# Altium PCB PCB1.pcbdoc (part 1 of 2)
Units mil, origin at the board's own origin, x right, y up, seen from the top; angles counter-clockwise.
Board outline 1771.65 x 1825.33 mil, 2 copper layers (Top Layer, Bottom Layer), stack 62.206 mil thick; 72 components, 46 nets, 229 pads, 305 vias.
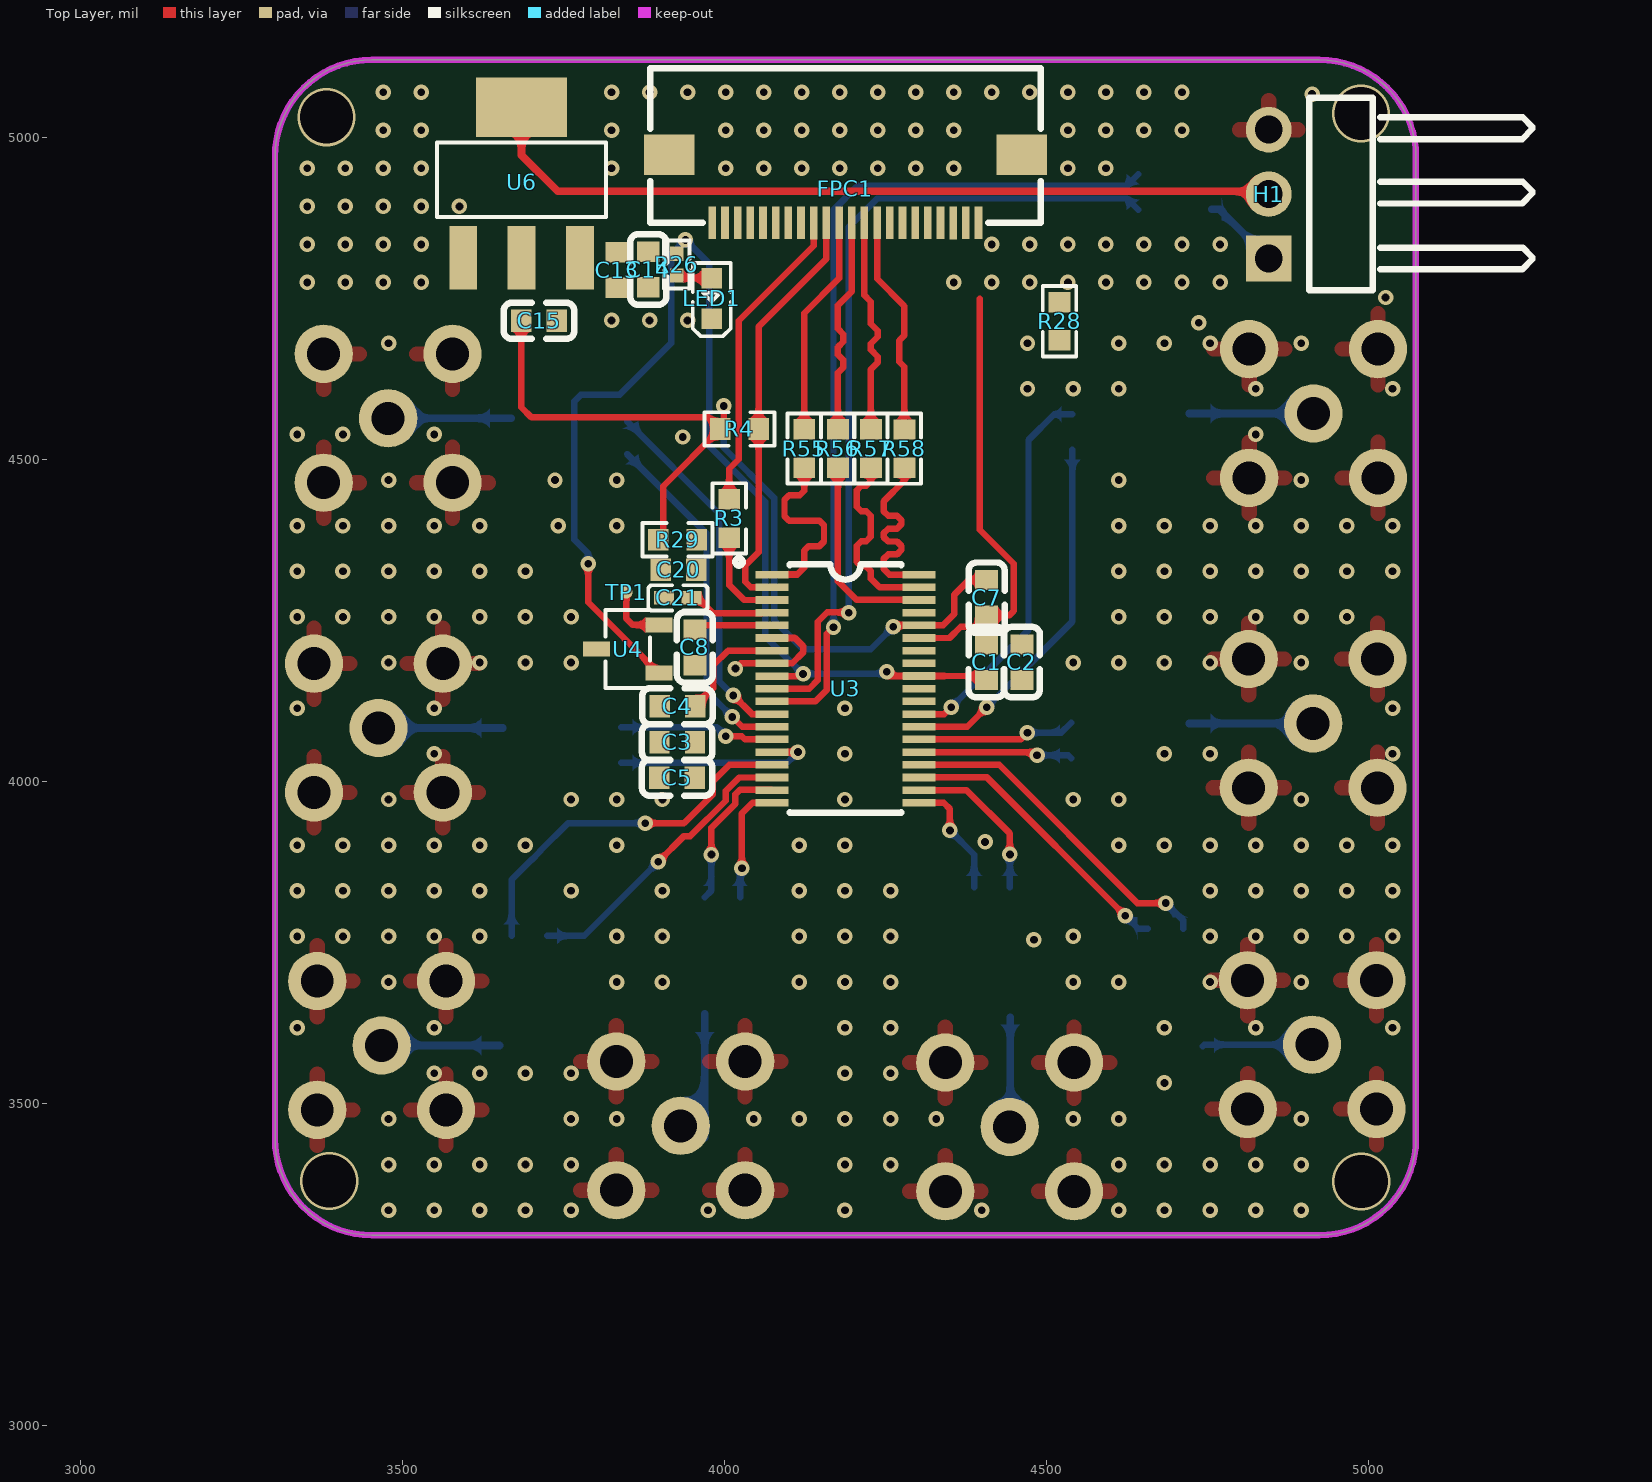
[diagram p0: Top Layer view]
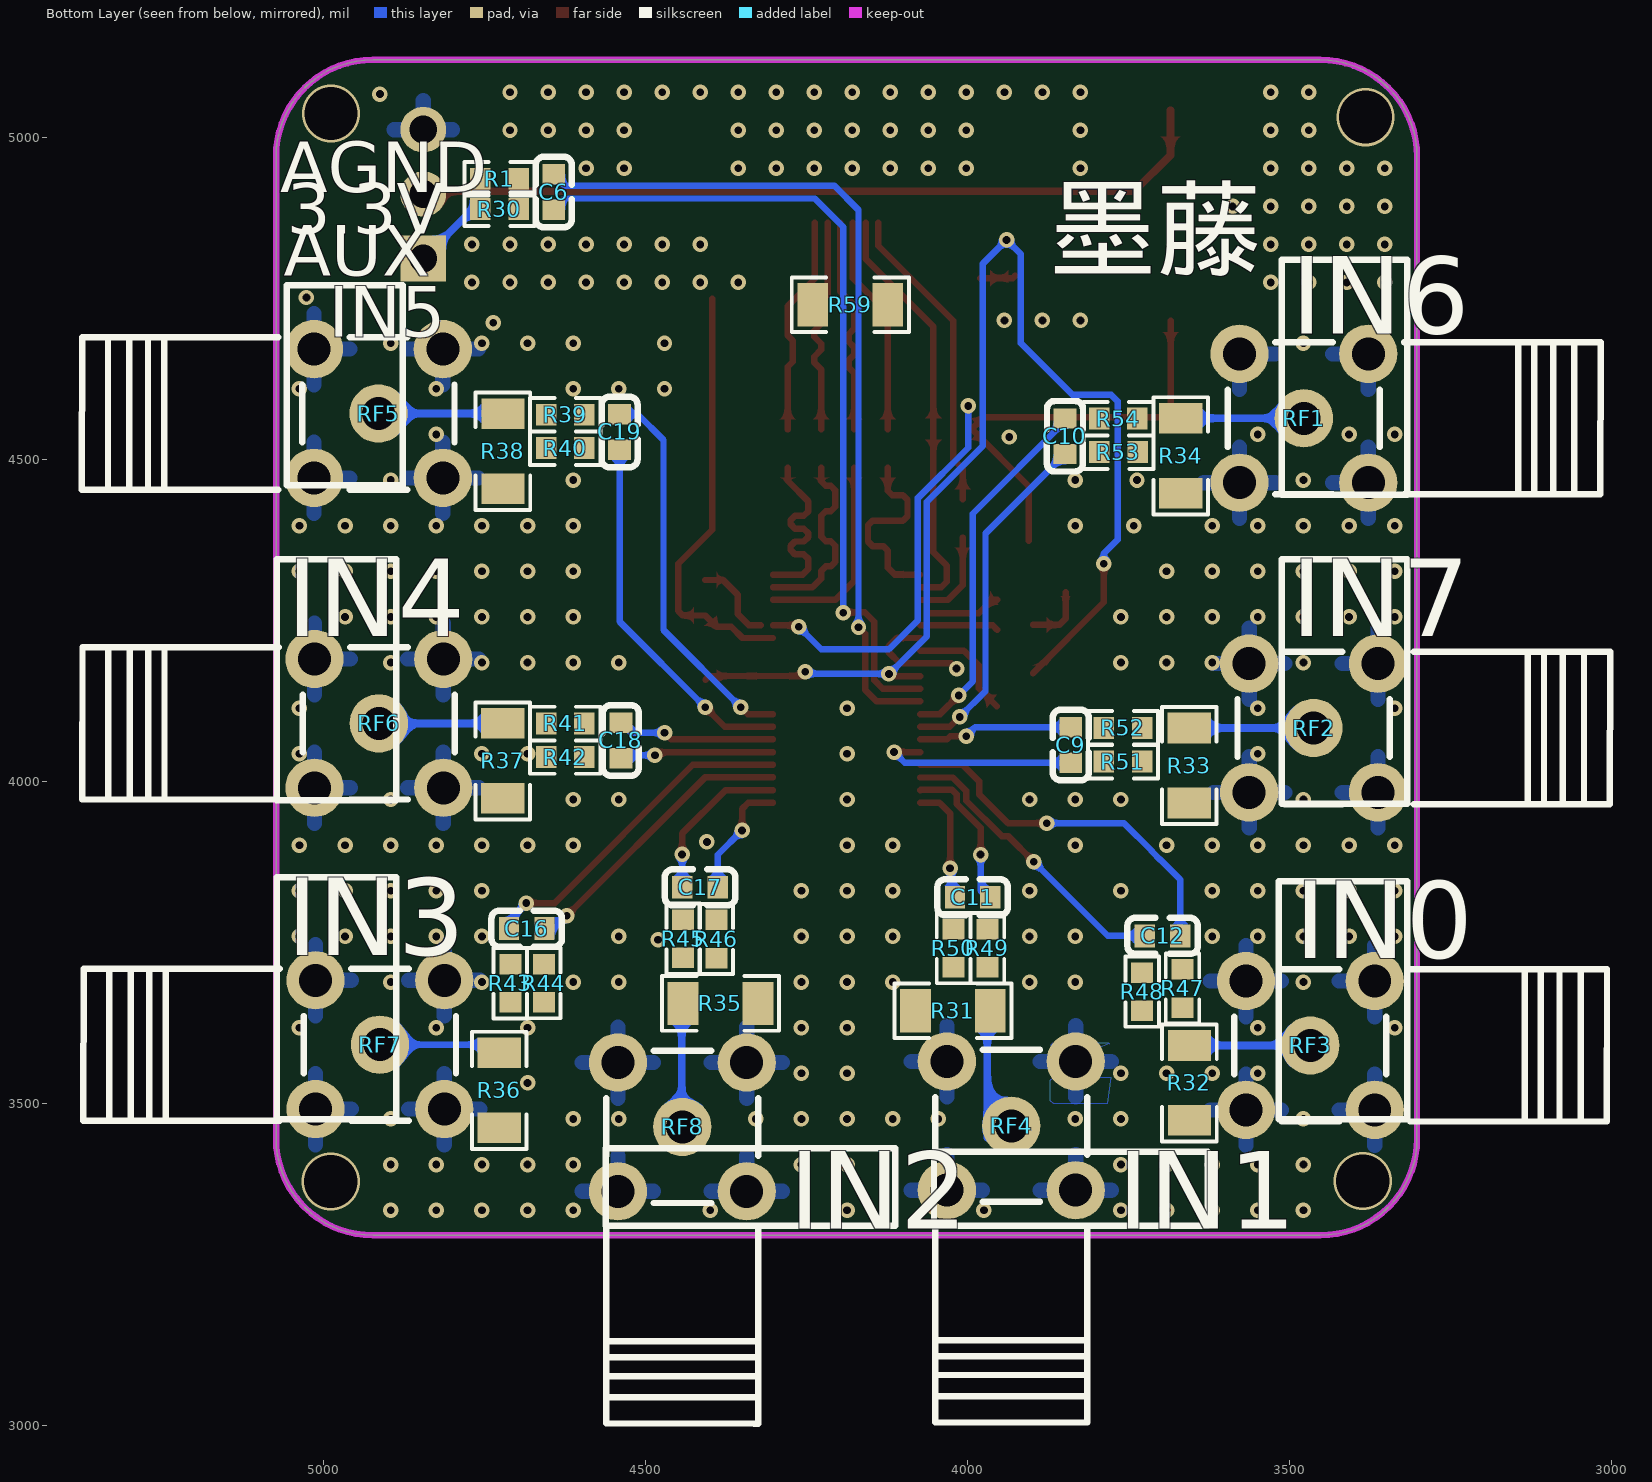
[diagram p1: Bottom Layer view, seen from below]

## Layer stack, top to bottom
Top Solder Mask Layer: solder mask 0.394, Dk 3.3
Top Layer: signal copper 1.379
Dielectric1: surface 59.449, FR4, Dk 4.5
Bottom Layer: signal copper 1.378
Bottom Solder Mask Layer: solder mask 0.394, Dk 3.3

## Board outline
3452.36,3294.69 4924.01,3294.69 ccw(c4924.01,3444.69) 5074.01,3444.69 5074.01,4970.05 ccw(c4924.03,4970.04) 4924.01,5120.02 3452.36,5120.02 ccw(c3452.34,4970.04) 3302.36,4970.05 3302.36,3444.69 ccw(c3452.36,3444.69)

## Design rules (kind name [scope] priority, off if disabled: settings)
BoardOutlineClearance copperThickness1oz [All] p0: genericclearance=10 ignorepadtopadclearanceinfootprint=FALSE except(0: Arc-SplitContinuation Track-SplitContinuation SMDPad-SplitContinuation THPad-SplitContinuation Via-SplitContinuation Fill-SplitContinuation Poly-SplitContinuation Region-SplitContinuation Text-SplitContinuation)
BoardOutlineClearance copperThickness2oz [All] p0: genericclearance=10 ignorepadtopadclearanceinfootprint=FALSE except(0: Arc-SplitContinuation Track-SplitContinuation SMDPad-SplitContinuation THPad-SplitContinuation Via-SplitContinuation Fill-SplitContinuation Poly-SplitContinuation Region-SplitContinuation Text-SplitContinuation)
BoardOutlineClearance Plane_innerPlane [All] p0: genericclearance=10 ignorepadtopadclearanceinfootprint=FALSE except(0: Arc-SplitContinuation Track-SplitContinuation SMDPad-SplitContinuation THPad-SplitContinuation Via-SplitContinuation Fill-SplitContinuation Poly-SplitContinuation Region-SplitContinuation Text-SplitContinuation)
BoardOutlineClearance Copper_copperRegion [All] p0: genericclearance=10 ignorepadtopadclearanceinfootprint=FALSE except(0: Arc-SplitContinuation Track-SplitContinuation SMDPad-SplitContinuation THPad-SplitContinuation Via-SplitContinuation Fill-SplitContinuation Poly-SplitContinuation Region-SplitContinuation Text-SplitContinuation)
BoardOutlineClearance otherClearance [All] p0: genericclearance=10 ignorepadtopadclearanceinfootprint=FALSE except(0: Arc-SplitContinuation Track-SplitContinuation SMDPad-SplitContinuation THPad-SplitContinuation Via-SplitContinuation Fill-SplitContinuation Poly-SplitContinuation Region-SplitContinuation Text-SplitContinuation)
Clearance copperThickness1oz [All] p1: gap=7 ignorepadtopadclearanceinfootprint=FALSE
Clearance copperThickness2oz [All] p1: gap=7 ignorepadtopadclearanceinfootprint=FALSE
Clearance Plane_innerPlane [All] p1: gap=7 ignorepadtopadclearanceinfootprint=FALSE
Clearance Copper_copperRegion [All] p1: gap=7 ignorepadtopadclearanceinfootprint=FALSE
Clearance otherClearance [All] p1: gap=7 ignorepadtopadclearanceinfootprint=FALSE
DiffPairsRouting differentialPair [All] p1: maxuncoupledlength=10 minlimit=6 maxlimit=Infinity mostfreqgap=6 toplayer_minwidth=5 toplayer_prefwidth=10 toplayer_maxwidth=100 bottomlayer_minwidth=5 bottomlayer_prefwidth=10 bottomlayer_maxwidth=100
PasteMaskExpansion pasteMaskExpansion [All] p1: expansion=0
PlaneConnect innerPlane [All] p1: planeconnectstyle=Relief reliefexpansion=20 reliefentries=4 reliefconductorwidth=10 reliefairgap=10
PolygonConnect copperRegion [All] p1: connectstyle=Relief reliefentries=4 reliefconductorwidth=23.622 polygonreliefangle="90 Angle" airgapwidth=10
RoutingVias viaSize [All] p1: viastyle="Through Hole" holewidth=12.0078 minholewidth=11.811 maxholewidth=248.0314 width=12.0078 minwidth=11.811 maxwidth=248.0314
SolderMaskExpansion solderMaskExpansion [All] p1: useseparateexpansions=TRUE expansion=2 expansionbottom=2
Width copperThickness1oz [All] p1: maxlimit=100 minlimit=5 preferedwidth=10
Width copperThickness2oz [All] p1: maxlimit=100 minlimit=8 preferedwidth=10

## Components (designator, comment, footprint, x,y, rotation, side; value= is the part's Value field where it differs from the comment)
C1 "" C0603 4407.22,4184.71 r90 top
C2 "" C0603 4462.22,4184.71 r90 top
C3 "" C0603 3926.83,4060.33 r0 top
C4 "" C0603 3927.19,4116.15 r0 top
C5 "" C0603 3926.8,4005.33 r180 top
C6 "" C0603 4642.72,4914.68 r270 bottom
C7 "" C0603 4407.36,4284.69 r270 top
C8 "" C0603 3954.39,4207.58 r90 top
C9 "" C0603 3840.05,4055.92 r90 bottom
C10 "" C0603 3848.99,4535.49 r90 bottom
C11 "" C0603 3992.36,3819.69 r180 bottom
C12 "" C0603 3697.36,3759.69 r180 bottom
C13 "" C0603 3833.49,4793.58 r90 top
C14 "" C0603 3881.86,4794.37 r90 top
C15 "" C0603 3712.36,4714.69 r0 top
C16 "" C0603 4684.84,3770.9 r180 bottom
C17 "" C0603 4415.55,3835.13 r180 bottom
C18 "" C0603 4538.61,4063.17 r270 bottom
C19 "" C0603 4540.63,4542.11 r270 bottom
C20 "" C0603 3928.98,4328.3 r180 top
C21 "" C0402 3927.97,4284.52 r180 top
FPC1 "" FPC-SMD_P0.5-22P_FGS-XJ-H2.0 4188.19,4919.69 r0 top
H1 "" HDR-TH_3P-P2.54-H-M-W10.4 4845.4,4911.52 r90 top
LED1 "" LED0603-RD 3980.72,4749.54 r90 top
R1 "" R0603 4727.09,4935.36 r180 bottom
R3 "" R0603 4007.66,4407.87 r270 top
R4 "" R0603 4023.54,4546.77 r180 top
R26 "" R0402 3926.22,4802.07 r90 top
R28 "" R0603 4520.58,4714.08 r270 top
R29 "" R0603 3927.36,4374.69 r180 top
R30 "" R0603 4727.09,4888.06 r180 bottom
R31 "" R1206 4022.94,3643.34 r180 bottom
R32 "" R1206 3655.84,3531.3 r90 bottom
R33 "" R1206 3655.97,4024.17 r90 bottom
R34 "" R1206 3669.23,4505.1 r90 bottom
R35 "" R1206 4383.9,3654.9 r0 bottom
R36 "" R1206 4727.36,3519.69 r90 bottom
R37 "" R1206 4721.99,4031.31 r90 bottom
R38 "" R1206 4721.81,4512.16 r270 bottom
R39 "" R0603 4624.95,4568.91 r0 bottom
R40 "" R0603 4624.93,4517.02 r0 bottom
R41 "" R0603 4625,4089.5 r0 bottom
R42 "" R0603 4624.96,4037.31 r0 bottom
R43 "" R0603 4710.27,3686.16 r270 bottom
R44 "" R0603 4658.24,3686.19 r270 bottom
R45 "" R0603 4441.96,3755.31 r270 bottom
R46 "" R0603 4390.34,3754.71 r270 bottom
R47 "" R0603 3666.46,3678.02 r90 bottom
R48 "" R0603 3729.16,3673.02 r90 bottom
R49 "" R0603 3969.38,3740.61 r90 bottom
R50 "" R0603 4022.08,3740.61 r90 bottom
R51 "" R0603 3758.88,4030.32 r0 bottom
R52 "" R0603 3758.88,4082.62 r0 bottom
R53 "" R0603 3765.94,4510.75 r0 bottom
R54 "" R0603 3766.09,4562.77 r0 bottom
R55 "" R0603 4124.2,4516.4 r90 top
R56 "" R0603 4176.5,4516.4 r90 top
R57 "" R0603 4227.53,4516.4 r90 top
R58 "" R0603 4279.58,4516.33 r90 top
R59 "" R1206 4182.36,4739.69 r180 bottom
RF1 "" ANT-TH_KH-SMA-K513-G 3477.99,4563.39 r0 bottom
RF2 "" ANT-TH_KH-SMA-K513-G 3462.99,4082.44 r0 bottom
RF3 "" ANT-TH_KH-SMA-K513-G 3467.99,3589.49 r0 bottom
RF4 "" ANT-TH_KH-SMA-K513-G 3932.36,3464.69 r90 bottom
RF5 "" ANT-TH_KH-SMA-K513-G 4915.03,4570.78 r180 bottom
RF6 "" ANT-TH_KH-SMA-K513-G 4914.35,4089.56 r180 bottom
RF7 "" ANT-TH_KH-SMA-K513-G 4912.74,3590.69 r180 bottom
RF8 "" ANT-TH_KH-SMA-K513-G 4443.16,3462.99 r90 bottom
TP1 "" Test-Point-0.5mm 3847.89,4293.39 r0 top
U3 "" TSSOP-38_L9.7-W4.4-P0.50-LS6.4-BL 4188.19,4143.47 r270 top
U4 "" SOT-23-3_L2.9-W1.6-P1.90-LS2.8-BR 3849.99,4205.09 r0 top
U6 "" SOT-223-3_L6.5-W3.4-P2.30-LS7.0-BR 3685.14,4929.68 r270 top

## Footprints (in the part's own frame and the unit in brackets; to place one, negate y for a bottom-side part, rotate by r counter-clockwise, add the part's x,y. Pads: shape width x height; smd on the part's side, far side on the other; paste and mask are expansions set on the pad)
ANT-TH_KH-SMA-K513-G [mm]
  round 2.3 hole 1.3: 1(-2.54,-2.54) 2(-2.54,2.54) 3(2.54,2.54) 4(2.54,-2.54) 5(0,0)
  silkscreen extent -11.7,-3 3,3
C0402 [mm]
  rect 0.79x0.54 smd: 1(-0.545,0) 2(0.545,0)
  silkscreen extent -1.17,-0.5 1.17,0.5
C0603 [mm]
  rect 0.8x0.9 smd: 1(-0.7,0) 2(0.7,0)
  silkscreen extent -1.39,-0.71 1.39,0.71
FPC-SMD_P0.5-22P_FGS-XJ-H2.0 [mm]
  rect 0.3x1.3 smd: 1(-5.252,-1.338) 2(-4.752,-1.338) 3(-4.252,-1.338) 4(-3.752,-1.338) 5(-3.252,-1.338) 6(-2.752,-1.338) 7(-2.252,-1.338) 8(-1.752,-1.338) 9(-1.25,-1.339) 10(-0.752,-1.338) 11(-0.252,-1.338) 12(0.248,-1.338) 13(0.748,-1.338) 14(1.248,-1.338) 15(1.748,-1.338) 16(2.248,-1.338) 17(2.748,-1.338) 18(3.248,-1.338) 19(3.748,-1.338) 20(4.25,-1.339) 21(4.748,-1.338) 22(5.248,-1.338)
  rect 2x1.6 smd: 23(6.95,1.339) 24(-6.95,1.339)
  silkscreen extent -7.7,-1.34 7.7,4.76
HDR-TH_3P-P2.54-H-M-W10.4 [mm]
  rect 1.8x1.8 hole 1.1: 1(-2.54,0)
  round 1.8 hole 1.1: 2(0,0) 3(2.54,0)
  silkscreen extent -3.8,-10.4 3.8,-1.6
LED0603-RD [mm]
  rect 0.8x0.8 smd: 1(-0.799,0) 2(0.799,0)
  silkscreen extent -1.49,-0.75 1.39,0.76
R0402 [mm]
  rect 0.566x0.54 smd: 1(-0.433,0) 2(0.433,0)
  silkscreen extent -0.94,-0.5 0.94,0.5
R0603 [mil]
  rect 31.75x34.02 smd: 1(-29.66,0) 2(29.66,0)
  silkscreen extent -55,-26 55,26
R1206 [mil]
  rect 47.54x66.97 smd: 1(-58.22,0) 2(58.22,0)
  silkscreen extent -91,-42 91,42
SOT-23-3_L2.9-W1.6-P1.90-LS2.8-BR [mm]
  rect 1.07x0.6 smd: 1(1.235,-0.95) 2(1.235,0.95) 3(-1.235,0)
  silkscreen extent -0.88,-1.54 0.88,1.54
SOT-223-3_L6.5-W3.4-P2.30-LS7.0-BR [mm]
  rect 2.5x1.1 smd: 1(2.97,-2.3) 2(2.97,0) 3(2.97,2.3)
  rect 2.34x3.6 smd: 4(-2.97,0)
  silkscreen extent -1.57,-3.33 1.37,3.33
Test-Point-0.5mm [mm]
  round 0.5 smd: 1(0,0)
TSSOP-38_L9.7-W4.4-P0.50-LS6.4-BL [mm]
  rect 0.3x1.3 smd: 1(-4.501,-2.899) 2(-3.999,-2.901) 3(-3.498,-2.901) 4(-2.999,-2.901) 5(-2.499,-2.901) 6(-1.999,-2.901) 7(-1.499,-2.901) 8(-0.999,-2.901) 9(-0.499,-2.901) 10(0.001,-2.901) 11(0.501,-2.901) 12(1.001,-2.901) 13(1.501,-2.901) 14(2.001,-2.901) 15(2.501,-2.901) 16(3.001,-2.901) 17(3.501,-2.901) 18(4.001,-2.901) 19(4.501,-2.901) 20(4.5,2.899) 21(4.001,2.9) 22(3.501,2.899) 23(3.002,2.899) 24(2.499,2.901) 25(2,2.9) 26(1.5,2.9) 27(1,2.9) 28(0.5,2.9) 29(0,2.9) 30(-0.5,2.9) 31(-1,2.9) 32(-1.5,2.9) 33(-2,2.9) 34(-2.5,2.9) 35(-3,2.9) 36(-3.5,2.9) 37(-4,2.9) 38(-4.5,2.9)
  silkscreen extent -5.14,-4.34 4.9,2.2

## Via types
v1: diameter 24.02, hole 12.01, Top Layer to Bottom Layer, 301 vias
v2: diameter 90.55, hole 82.68, Top Layer to Bottom Layer, 4 vias

## Nets (pads, with @x,y where several pads share a name; then routed paths per layer and width w, separated by ;. In a path a pad name is that pad's centre, name@x,y a point inside that pad or via, vN(x,y) a via of type N, cw(c..) or ccw(c..) an arc to the next point about the centre after c; other vN are vias at no path point)
3.3V: C7.1 C15.1 H1.2 R4.2 R29.2 U3.34 U6.2 U6.4 | length 2716.9
  Top Layer w10: C15.1@3684.8,4714.69 3684.8,4580.67 3700.78,4564.69 3975.96,4564.69 R4.2@3993.88,4546.77 ; R29.2@3905.16,4373.36 3905.16,4458.05 R4.2@3993.88,4546.77 ; v1(3999.37,4582.53) 3999.37,4552.26 R4.2@3993.88,4546.77 ; v1(4262.36,4239.69) 4264.56,4241.89 U3.34@4302.35,4241.89 ; U3.34@4321.64,4242.02 4339.69,4242.02 4357.36,4259.69 4357.36,4289.69 4379.92,4312.25 C7.1@4407.36,4312.25
  Top Layer w12: U6.4@3685.14,5041.6 3685.14,4971.92 3741.32,4915.73 4841.18,4915.73 H1.2@4845.4,4911.52
  Bottom Layer w10: v1(3999.37,4582.53) 3999.37,4517.68 4077.36,4439.69 4077.36,4249.69 4122.36,4204.69 4227.36,4204.69 v1(4262.36,4239.69)
5V_USB: C1.1 C2.1 C13.2 C14.2 FPC1.1 FPC1.2 FPC1.3 FPC1.4 FPC1.5 FPC1.6 FPC1.7 FPC1.8 R26.2 U3.9 U3.30 U4.1 U6.3 | length 1923.4
  Top Layer w10: v1(3788.61,4337.69) 3788.61,4277.69 U4.1@3898.61,4167.69 ; U3.9@4073.97,4163.11 4119.05,4163.11 v1(4122.36,4166.42) ; v1(4252.36,4169.69) 4258.91,4163.15 U3.30@4302.35,4163.15 4401.22,4163.15 C1.1@4407.22,4157.15
  Bottom Layer w10: v1(3788.61,4337.69) 3788.61,4353.44 3767.36,4374.69 3767.36,4589.69 3777.36,4599.69 3837.36,4599.69 3917.36,4679.69 3917.36,4817.96 v1(3939.71,4840.31) 3976.38,4803.64 3976.38,4520.85 4063.35,4433.89 4063.35,4224.87 v1@4121.34,4166.87 ; v1(4122.36,4166.42) 4249.09,4166.42 v1(4252.36,4169.69)
$1N881: C3.2 C4.2 C5.1 U3.7 | length 175.6
  Top Layer w10: C4.2@3954.75,4116.15 3983.09,4144.49 3983.09,4179.69 4005.88,4202.48 U3.7@4073.97,4202.48
$1N1310: R3.2 U3.3 | length 149.7
  Top Layer w10: R3.2@4007.66,4378.21 4007.66,4304.39 4030.86,4281.2 U3.3@4073.97,4281.2
$1N2306: C20.1 C21.1 R29.1 U3.4 | length 112.3
  Top Layer w10: C21.1@3954.21,4281.44 3962.38,4281.44 3983.07,4260.75 U3.4@4057.98,4260.75
$1N2496: C10.2 R54.2 U3.12 | length 570.3
  Top Layer w10: v1(4014.09,4132.97) 4043,4104.06 U3.12@4073.97,4104.06
  Bottom Layer w10: C10.2@3848.99,4563.05 3848.99,4558.65 3992.36,4415.28 3992.36,4154.69 v1(4014.09,4132.97)
$1N2502: C10.1 R53.2 U3.13 | length 543.9
  Top Layer w10: v1(4012.36,4099.69) 4027.69,4084.37 U3.13@4073.97,4084.37
  Bottom Layer w10: C10.1@3848.99,4507.93 3972.36,4384.56 3972.36,4139.69 v1(4012.36,4099.69)
$1N2508: C9.2 R52.2 U3.14 | length 241.7
  Top Layer w10: v1(4002.36,4069.69) 4027.36,4069.69 4032.36,4064.69 U3.14@4073.97,4064.69
  Bottom Layer w10: C9.2@3840.05,4083.48 3988.57,4083.48 v1(4002.36,4069.69)
$1N2515: C9.1 R51.2 U3.15 | length 324.7
  Top Layer w10: U3.15@4073.97,4045 4117.06,4045 v1@4117.36,4044.69
  Bottom Layer w10: C9.1@3840.05,4028.36 4097.66,4028.36 v1(4114.36,4045.06)
$1N2525: C12.2 R47.2 U3.16 | length 577.5
  Top Layer w10: v1(3877.36,3934.69) 3937.36,3934.69 3982.36,3979.69 3982.36,3999.69 4007.99,4025.32 U3.16@4073.97,4025.32
  Bottom Layer w10: C12.2@3669.8,3759.69 3669.8,3847.13 3700.24,3877.57 3700.82,3877.57 3714.29,3891.03 3714.29,3891.62 3757.36,3934.69 v1(3877.36,3934.69)
$1N2534: C11.2 R49.2 U3.18 | length 239.9
  Top Layer w10: v1(3980.1,3885.86) 3980.1,3927.43 4017.36,3964.69 4017.36,3979.69 4024.43,3986.76 4073.16,3986.76 U3.18@4073.97,3985.95
  Bottom Layer w10: C11.2@3969.49,3819.48 3980.1,3830.09 v1(3980.1,3885.86)
$1N2541: C12.1 R48.2 U3.17 | length 459.7
  Top Layer w10: v1(3897.36,3874.69) 3937.36,3914.69 3947.36,3914.69 4002.36,3969.69 4002.36,3984.69 4023.3,4005.63 U3.17@4073.97,4005.63
  Bottom Layer w10: C12.1@3724.92,3759.69 3782.36,3759.69 v1(3897.36,3874.69)
$1N2549: C11.1 R50.2 U3.19 | length 184.8
  Top Layer w10: v1(4027.36,3864.69) 4027.36,3949.69 4043.93,3966.26 U3.19@4073.97,3966.26
  Bottom Layer w10: C11.1@4024.61,3819.48 4024.61,3861.94 v1(4027.36,3864.69)
$1N3102: C19.1 R39.1 U3.27 | length 603.9
  Top Layer w10: U3.27@4302.35,4104.1 4341.77,4104.1 v1(4352.36,4114.69)
  Bottom Layer w10: v1(4352.36,4114.69) 4472.36,4234.69 4472.36,4529.69 4512.34,4569.67 C19.1@4540.63,4569.67
$1N3111: C19.2 R40.1 U3.26 | length 572.6
  Top Layer w10: U3.26@4302.35,4084.41 4377.08,4084.41 v1(4407.36,4114.69)
  Bottom Layer w10: v1(4407.36,4114.69) 4540.63,4247.96 C19.2@4540.63,4514.55
$1N3136: C16.1 R43.1 U3.23 | length 523
  Top Layer w10: U3.23@4302.33,4025.28 4426.78,4025.28 4641.4,3810.65 v1(4685.5,3810.65)
  Bottom Layer w10: v1(4685.5,3810.65) 4712.4,3783.75 C16.1@4712.4,3770.9
$1N3142: C16.2 R44.1 U3.22 | length 452.2
  Top Layer w10: U3.22@4302.33,4005.66 4407.97,4005.66 v1(4622.74,3790.89)
  Bottom Layer w10: v1(4622.74,3790.89) 4642.72,3770.9 C16.2@4657.28,3770.9
$1N3148: C17.1 R45.1 U3.21 | length 252.7
  Top Layer w10: U3.21@4302.36,3985.94 4376.12,3985.94 4443.53,3918.52 v1(4443.53,3886.07)
  Bottom Layer w10: C17.1@4443.11,3835.13 4443.53,3835.56 v1(4443.53,3886.07)
$1N3155: C17.2 R46.1 U3.20 | length 189.1
  Top Layer w10: U3.20@4302.33,3966.29 4340.77,3966.29 4350.41,3956.64 v1(4350.41,3923.33)
  Bottom Layer w10: v1(4350.41,3923.33) 4387.99,3885.75 C17.2@4387.99,3835.13
$1N3547: R34.2 R54.1 RF1.5 | length 191.3
  Bottom Layer w12: RF1.5@3477.99,4563.39 3669.15,4563.39 R34.2@3669.23,4563.32
$1N3571: R33.2 R52.1 RF2.5 | length 192.9
  Bottom Layer w12: RF2.5@3462.99,4082.44 R33.2@3655.92,4082.44
$1N3593: R32.2 R47.1 RF3.5 | length 192.8
  Bottom Layer w12: RF3.5@3458.01,3589.52 R32.2@3650.84,3589.52
$1N3616: R31.2 R49.1 RF4.5 | length 191.9
  Bottom Layer w12: RF4.5@3969.64,3446.49 3969.64,3638.26 R31.2@3969.72,3638.34
$1N11847: C6.1 R1.2 U3.11 | length 1338.3
  Top Layer w10: U3.11@4073.97,4123.74 4141.41,4123.74 4159.37,4141.7 4159.37,4228.77 v1(4169.59,4238.99)
  Bottom Layer w10: v1(4169.59,4238.99) 4169.59,4886.92 4207.36,4924.69 4625.17,4924.69 C6.1@4642.72,4942.24
$1N11929: C6.2 R30.2 U3.10 | length 1295.6
  Top Layer w10: U3.10@4073.97,4143.43 4131.88,4143.43 4145.35,4156.89 4145.35,4247.27 4160.06,4261.98 4192.56,4261.98 v1(4193.1,4261.43)
  Bottom Layer w10: v1(4193.1,4261.43) 4193.1,4860.43 4237.36,4904.69 4625.14,4904.69 C6.2@4642.72,4887.12
$1N12022: LED1.2 R26.1 | length 56.2
  Top Layer w10: R26.1@3926.22,4785.03 3930.24,4781.01 LED1.2@3980.71,4781.01
$1N16896: R38.1 R39.2 RF5.5 | length 193.4
  Bottom Layer w12: R38.1@4721.81,4570.38 4722.21,4570.78 RF5.5@4915.03,4570.78
$1N16947: R37.2 R41.2 RF6.5 | length 192.3
  Bottom Layer w12: R37.2@4721.99,4089.53 RF6.5@4914.31,4089.53
$1N17152: R36.2 R43.2 RF7.5 | length 170.7
  Bottom Layer w10: R36.2@4742.98,3588.3 4745.37,3590.69 RF7.5@4912.74,3590.69
$1N17239: C18.2 R42.1 U3.24 | length 240.1
  Top Layer w10: U3.24@4302.4,4045.09 4480.68,4045.09 v1(4485.67,4040.09)
  Bottom Layer w10: v1(4485.67,4040.09) 4534.12,4040.09 C18.2@4538.61,4035.61
$1N17244: C18.1 R41.1 U3.25 | length 247
  Top Layer w10: U3.25@4302.35,4064.73 4460.31,4064.73 v1(4470.67,4075.09)
  Bottom Layer w10: v1(4470.67,4075.09) 4522.97,4075.09 C18.1@4538.61,4090.73
$1N17369: C8.2 TP1.1 U3.5 U4.2 | length 218.1
  Top Layer w10: TP1.1@3847.89,4293.39 3847.89,4252.49 3857.89,4242.49 U4.2@3898.61,4242.49 ; C8.2@3954.39,4235.14 3961.09,4241.85 U3.5@4073.97,4241.85
$1N20017: R35.2 R45.2 RF8.5 | length 178.6
  Bottom Layer w12: RF8.5@4423.16,3462.99 4444.19,3484.02 R35.2@4444.19,3632.84
AGND: C1.2 C2.2 C3.1 C4.1 C5.2 C8.1 C20.2 C21.2 H1.3 R1.1 R28.2 R31.1 R32.1 R33.1 R34.1 R35.1 R36.1 R37.1 R38.2 R40.2 R42.2 R44.2 R46.2 R48.1 R50.1 R51.1 R53.1 RF1.1 RF1.2 RF1.3 RF1.4 RF2.1 RF2.2 RF2.3 RF2.4 RF3.1 RF3.2 RF3.3 RF3.4 RF4.1 RF4.2 RF4.3 RF4.4 RF5.1 RF5.2 RF5.3 RF5.4 RF6.1 RF6.2 RF6.3 RF6.4 RF7.1 RF7.2 RF7.3 RF7.4 RF8.1 RF8.2 RF8.3 RF8.4 U3.6 U3.8 U3.28 U3.29 U3.31 U3.32 U4.3 | length 178.9
  Top Layer w10: v1(4017.36,4174.69) 4025.47,4182.8 U3.8@4073.97,4182.8 4105.47,4182.8 4122.36,4199.69 4122.36,4209.69 4109.89,4222.17 U3.6@4073.97,4222.17
  other v1: 3478.7,3333.63 3549.57,3333.63 3620.43,3333.63 3691.3,3333.63 3762.16,3333.63 3974.76,3333.63 4187.36,3333.63 4399.96,3333.63 4612.56,3333.63 4683.42,3333.63 4754.29,3333.63 4825.16,3333.63 4896.02,3333.63 3478.7,3404.5 3549.57,3404.5 3620.43,3404.5 3691.3,3404.5 3762.16,3404.5 4187.36,3404.5 4258.23,3404.5 4612.56,3404.5 4683.42,3404.5 4754.29,3404.5 4825.16,3404.5 4896.02,3404.5 3478.7,3475.36 3762.16,3475.36 3833.03,3475.36 4045.63,3475.36 4116.49,3475.36 4187.36,3475.36 4258.23,3475.36 4329.09,3475.36 4541.69,3475.36 4612.56,3475.36 4896.02,3475.36 4683.42,3531.23 3549.57,3546.23 3620.43,3546.23 3691.3,3546.23 3762.16,3546.23 4187.36,3546.23 4258.23,3546.23 3336.97,3617.09 3549.57,3617.09 4187.36,3617.09 4258.23,3617.09 4683.42,3617.09 4825.16,3617.09 5037.75,3617.09 3478.7,3687.96 3833.03,3687.96 3903.9,3687.96 4116.49,3687.96 4187.36,3687.96 4258.23,3687.96 4541.69,3687.96 4612.56,3687.96 4754.29,3687.96 4896.02,3687.96 4480.82,3753.83 3336.97,3758.83 3407.83,3758.83 3478.7,3758.83 3549.57,3758.83 3620.43,3758.83 3833.03,3758.83 3903.9,3758.83 4116.49,3758.83 4187.36,3758.83 4258.23,3758.83 4541.69,3758.83 4754.29,3758.83 4825.16,3758.83 4896.02,3758.83 4966.89,3758.83 5037.75,3758.83 3336.97,3829.69 3407.83,3829.69 3478.7,3829.69 3549.57,3829.69 3620.43,3829.69 3762.16,3829.69 3903.9,3829.69 4116.49,3829.69 4187.36,3829.69 4258.23,3829.69 4754.29,3829.69 4825.16,3829.69 4896.02,3829.69 4966.89,3829.69 5037.75,3829.69 3336.97,3900.56 3407.83,3900.56 3478.7,3900.56 3549.57,3900.56 3620.43,3900.56 3691.3,3900.56 3833.03,3900.56 4116.49,3900.56 4187.36,3900.56 4612.56,3900.56 4683.42,3900.56 4754.29,3900.56 4825.16,3900.56 4896.02,3900.56 4966.89,3900.56 5037.75,3900.56 4404.96,3905.56 3478.7,3971.42 3762.16,3971.42 3833.03,3971.42 3903.9,3971.42 4187.36,3971.42 4541.69,3971.42 4612.56,3971.42 4896.02,3971.42 3549.57,4042.29 4187.36,4042.29 4683.42,4042.29 4754.29,4042.29 5037.75,4042.29 3336.97,4113.16 3549.57,4113.16 4187.36,4113.16 5037.75,4113.16 3478.7,4184.02 3620.43,4184.02 3691.3,4184.02 3762.16,4184.02 4541.69,4184.02 4612.56,4184.02 4683.42,4184.02 4754.29,4184.02 4896.02,4184.02 3336.97,4254.89 3407.83,4254.89 3478.7,4254.89 3549.57,4254.89 3620.43,4254.89 3691.3,4254.89 3762.16,4254.89 4612.56,4254.89 4683.42,4254.89 4754.29,4254.89 4825.16,4254.89 4896.02,4254.89 4966.89,4254.89 3336.97,4325.75 3407.83,4325.75 3478.7,4325.75 3549.57,4325.75 3620.43,4325.75 3691.3,4325.75 4612.56,4325.75 4683.42,4325.75 4754.29,4325.75 4825.16,4325.75 4896.02,4325.75 4966.89,4325.75 5037.75,4325.75 3336.97,4396.62 3407.83,4396.62 3478.7,4396.62 3549.57,4396.62 3620.43,4396.62 3742.16,4396.62 3833.03,4396.62 4612.56,4396.62 4683.42,4396.62 4754.29,4396.62 4825.16,4396.62 4896.02,4396.62 4966.89,4396.62 5037.75,4396.62 3478.7,4467.49 3737.16,4467.49 3833.03,4467.49 4612.56,4467.49 4896.02,4467.49 3935.49,4534.31 3336.97,4538.35 3407.83,4538.35 3549.57,4538.35 4825.16,4538.35 4470.82,4609.22 4541.69,4609.22 4612.56,4609.22 4825.16,4609.22 5037.75,4609.22 3478.7,4680.09 4470.82,4680.09 4612.56,4680.09 4683.42,4680.09 4754.29,4680.09 4896.02,4680.09 4736.89,4711.82 5026.89,4750.95 4912.75,5066.82
  other v2: 4989.1,3378.39 3386.66,3378.99 4988.84,5036.6
AUX: H1.1 R30.1 | length 120.3
  Bottom Layer w12: R30.1@4756.75,4888.06 4768.86,4888.06 H1.1@4845.4,4811.52
CS: R58.1 U3.38 | length 307.4
  Top Layer w10: R58.1@4279.58,4486.67 4279.58,4466.29 4247.36,4434.07 4247.36,4419.08 4254.43,4412.01 4268.16,4412.01 4275.23,4404.94 4275.23,4399.08 4268.16,4392.01 4254.43,4392.01 4247.36,4384.94 4247.36,4379.08 4254.43,4372.01 4268.16,4372.01 4275.23,4364.94 4275.23,4359.08 4268.16,4352.01 4254.43,4352.01 4247.36,4344.94 4247.36,4329.69 4256.43,4320.63 U3.38@4302.35,4320.63
DAISY: FPC1.9 R3.1 | length 483.8
  Top Layer w10: R3.1@4007.66,4437.53 4007.66,4484.99 4022.36,4499.69 4022.36,4714.69 4138.98,4831.31 FPC1.9@4138.98,4866.96
GND: C7.2 C13.1 C14.1 C15.2 FPC1.15 FPC1.16 FPC1.17 FPC1.18 FPC1.19 FPC1.20 FPC1.21 FPC1.22 FPC1.23 FPC1.24 LED1.1 R28.1 R59.1 R59.2 U3.33 U6.1 | length 671.1
  Top Layer w10: U3.33@4302.35,4222.21 4349.88,4222.21 4367.36,4239.69 4389.92,4239.69 C7.2@4407.36,4257.13 4442.36,4257.13 4449.43,4264.2 4449.43,4337.62 4396.73,4390.32 4396.73,4748.98
  other v1: 3824.92,4715.24 3883.97,4715.24 3943.03,4715.24 3352.48,4774.3 3411.53,4774.3 3470.59,4774.3 3529.64,4774.3 4356.42,4774.3 4415.47,4774.3 4474.53,4774.3 4533.58,4774.3 4592.64,4774.3 4651.69,4774.3 4710.75,4774.3 4769.8,4774.3 3352.48,4833.35 3411.53,4833.35 3470.59,4833.35 3529.64,4833.35 4415.47,4833.35 4474.53,4833.35 4533.58,4833.35 4592.64,4833.35 4651.69,4833.35 4710.75,4833.35 4769.8,4833.35 3352.48,4892.41 3411.53,4892.41 3470.59,4892.41 3529.64,4892.41 3588.7,4892.41 3352.48,4951.46 3411.53,4951.46 3470.59,4951.46 3529.64,4951.46 3824.92,4951.46 4002.09,4951.46 4061.14,4951.46 4120.2,4951.46 4179.25,4951.46 4238.31,4951.46 4297.36,4951.46 4356.42,4951.46 4533.58,4951.46 4592.64,4951.46 3470.59,5010.52 3529.64,5010.52 3824.92,5010.52 4002.09,5010.52 4061.14,5010.52 4120.2,5010.52 4179.25,5010.52 4238.31,5010.52 4297.36,5010.52 4356.42,5010.52 4533.58,5010.52 4592.64,5010.52 4651.69,5010.52 4710.75,5010.52 3470.59,5069.57 3529.64,5069.57 3824.92,5069.57 3883.97,5069.57 3943.03,5069.57 4002.09,5069.57 4061.14,5069.57 4120.2,5069.57 4179.25,5069.57 4238.31,5069.57 4297.36,5069.57 4356.42,5069.57 4415.47,5069.57 4474.53,5069.57 4533.58,5069.57 4592.64,5069.57 4651.69,5069.57 4710.75,5069.57
  other v2: 3382.29,5031.05
RST: FPC1.10 R4.1 U3.2 | length 654.9
  Top Layer w10: U3.2@4073.97,4300.91 4041.15,4300.91 4032.36,4309.69 4032.36,4334.69 4053.2,4355.53 R4.1@4053.2,4546.77 4053.2,4705.53 4158.58,4810.91 FPC1.10@4158.58,4867.02
SCLK: R57.1 U3.37 | length 307.6
  Top Layer w10: R57.1@4227.53,4486.74 4227.53,4465.53 4220.46,4458.45 4212.59,4458.45 4205.52,4451.38 4205.52,4426.16 4212.59,4419.08 4220.46,4419.08 4227.53,4412.01 4227.53,4379.71 4220.46,4372.64 4212.59,4372.64 4205.52,4365.57 4205.52,4340.34 4212.59,4333.27 4220.46,4333.27 4227.53,4326.2 4227.53,4314.52 4241.11,4300.95 U3.37@4302.35,4300.95
SDI: R55.1 U3.1 | length 307.7
  Top Layer w10: U3.1@4074.07,4320.69 4113.36,4320.69 4124.2,4331.53 4124.2,4357.94 4131.27,4365.01 4147.81,4365.01 4154.89,4372.08 4154.89,4397.31 4147.81,4404.38 4100.59,4404.38 4093.52,4411.45 4093.52,4436.68 4100.59,4443.75 4117.13,4443.75 4124.2,4450.82 R55.1@4124.2,4486.74
SDO: R56.1 U3.36 | length 314.2
  Top Layer w10: R56.1@4176.5,4486.74 4176.5,4310.55 4205.8,4281.26 U3.36@4302.35,4281.26
SPI1_CS: FPC1.14 R58.2 | length 345.1
  Top Layer w10: FPC1.14@4237.32,4867.02 4237.32,4779.86 4279.58,4737.59 4279.58,4691.91 4271.71,4684.04 4271.71,4651.26 4279.58,4643.39 R58.2@4279.58,4545.99
SPI1_MISO: FPC1.12 R56.2 | length 343.5
  Top Layer w10: R56.2@4176.5,4546.06 4176.5,4634.01 4184.74,4642.25 4184.74,4654.01 4176.5,4662.25 4176.5,4674.01 4184.74,4682.25 4184.74,4694.01 4176.5,4702.25 4176.5,4738.83 4197.95,4760.28 FPC1.12@4197.95,4867.02
SPI1_MOSI: FPC1.11 R55.2 | length 343.4
  Top Layer w10: R55.2@4124.2,4546.06 4124.2,4726.53 4178.27,4780.6 FPC1.11@4178.27,4867.02
SPI1_SCK: FPC1.13 R57.2 | length 343.3
  Top Layer w10: FPC1.13@4217.64,4867.02 4217.36,4866.74 4217.36,4754.69 4227.53,4744.52 4227.53,4710.03 4238.41,4699.15 4238.41,4690.03 4227.53,4679.15 4227.53,4670.03 4238.41,4659.15 4238.41,4650.03 4227.53,4639.15 R57.2@4227.53,4546.06
pads on no net: U3.35

## Polygon pours and split planes (outlines as drawn)
5V_USB on Top Layer (solid, remove dead copper, pour order 6): 3797.36,4754.69 3797.36,4789.69 3812.36,4804.69 3932.36,4804.69 3967.36,4839.69 4127.36,4839.69 4127.36,4889.69 4122.36,4894.69 3832.36,4894.69 3797.36,4859.69 3752.36,4859.69 3752.36,4754.69
3.3V on Top Layer (solid, remove dead copper, pour order 8): 3702.36,4694.69 3662.36,4694.69 3662.36,4859.69 3612.36,4909.69 3612.36,5089.69 3757.36,5089.69 3757.36,4909.69 3707.36,4859.69 3707.36,4739.83 3702.36,4734.83
5V_USB on Top Layer (solid, remove dead copper, pour order 10): 4482.36,4174.69 4342.36,4174.69 4337.36,4169.69 4277.36,4169.69 4277.36,4159.69 4322.36,4159.69 4327.36,4154.69 4372.36,4154.69 4387.36,4139.69 4482.36,4139.69
$1N11929 on Bottom Layer (solid, remove dead copper, pour order 16): 4622.36,4904.69 4723.49,4904.69 4723.49,4869.69 4622.36,4869.69
$1N11847 on Bottom Layer (solid, remove dead copper, pour order 18): 4622.36,4914.69 4722.36,4914.69 4722.36,4949.69 4712.36,4959.69 4622.36,4959.69
$1N881 on Top Layer (solid, remove dead copper, pour order 0): 3937.36,4134.69 3937.36,3984.69 3972.36,3984.69 3972.36,4134.69
$1N17369 on Top Layer (solid, remove dead copper, pour order 2): 3867.36,4229.69 3877.36,4219.69 4017.36,4219.69 4032.36,4234.69 4102.36,4234.69 4102.36,4249.37 3972.69,4249.37 3972.36,4249.69 3922.36,4249.69 3917.36,4254.69 3867.36,4254.69
$1N2306 on Top Layer (solid, remove dead copper, pour order 4): 4099.75,4255.43 3951.81,4255.43 3933.45,4273.79 3933.45,4303.96 3940.18,4310.69 3940.18,4389.23 3942.74,4391.79 3973.05,4391.79 3975.18,4389.65 3975.18,4282.89 3990.42,4267.66 4099.69,4267.66 4099.75,4267.59
AGND on Bottom Layer (solid, remove dead copper, pour order 68): 4737.36,4919.69 4772.36,4919.69 4797.36,4944.69 4797.36,4964.69 4807.36,4974.69 4877.36,4974.69 4892.36,4959.69 4892.36,4754.69 4872.36,4734.69 4572.36,4734.69 4542.36,4704.69 4357.36,4704.69 4332.36,4679.69 3962.36,4679.69 3872.36,4589.69 3667.36,4589.69 3632.36,4624.69 3632.36,4679.69 3602.36,4709.69 3302.36,4709.69 3302.36,3294.69 5077.36,3294.69 5082.36,3289.69 5082.36,5054.69 5007.36,5129.69 4737.36,5129.69
AGND on Top Layer (solid, remove dead copper, pour order 12): 4742.36,4919.69 4777.36,4919.69 4802.36,4944.69 4802.36,4964.69 4812.36,4974.69 4882.36,4974.69 4897.36,4959.69 4897.36,4754.69 4877.36,4734.69 4577.36,4734.69 4547.36,4704.69 4337.36,4704.69 4312.36,4679.69 3967.36,4679.69 3877.36,4589.69 3672.36,4589.69 3637.36,4624.69 3637.36,4679.69 3607.36,4709.69 3307.36,4709.69 3307.36,3294.69 5082.36,3294.69 5087.36,3289.69 5087.36,5054.69 5012.36,5129.69 4742.36,5129.69
GND on Top Layer (solid, remove dead copper, pour order 14): 4557.36,4734.69 4536.75,4714.08 4331.75,4714.08 4302.36,4684.69 4284.76,4684.69 4279.58,4679.51 4279.58,4591.91 4257.36,4569.69 3992.36,4569.69 3977.36,4584.69 3697.36,4584.69 3637.36,4644.69 3637.36,4709.69 3627.36,4719.69 3302.36,4719.69 3302.36,5144.69 4737.36,5144.69 4737.36,4924.69 4802.36,4859.69 4802.36,4744.69 4792.36,4734.69
GND on Bottom Layer (solid, pour order 70): 4557.36,4734.69 4536.75,4714.08 4331.75,4714.08 4302.36,4684.69 4284.76,4684.69 4279.58,4679.51 4279.58,4591.91 4257.36,4569.69 3992.36,4569.69 3977.36,4584.69 3697.36,4584.69 3637.36,4644.69 3637.36,4709.69 3627.36,4719.69 3302.36,4719.69 3302.36,5144.69 4737.36,5144.69 4737.36,4924.69 4802.36,4859.69 4802.36,4744.69 4792.36,4734.69
$1N2534 on Bottom Layer (solid, pour order 72): 3868.52,3557.85 3870.26,3559.59 3870.26,3590.71 3867.18,3593.79 3781.9,3593.79 3779.95,3591.85
$1N2549 on Bottom Layer (solid, pour order 74): 3777.36,3539.69 3867.36,3539.69 3872.36,3534.69 3872.36,3504.69 3867.36,3499.69 3782.36,3499.69
$1N3593 on Bottom Layer (solid, pour order 20): 3622.36,3664.69 3692.36,3664.69 3692.36,3564.69 3622.36,3564.69
$1N2541 on Bottom Layer (solid, pour order 22): 3707.36,3784.69 3752.36,3784.69 3752.36,3684.69 3707.36,3684.69
$1N3616 on Bottom Layer (solid, pour order 24): 3937.36,3729.69 3992.36,3729.69 3992.36,3609.69 3937.36,3609.69
$1N2549 on Bottom Layer (solid, pour order 26): 4002.36,3839.69 4042.36,3839.69 4042.36,3754.69 4002.36,3754.69
$1N2534 on Bottom Layer (solid, pour order 28): 3947.36,3839.69 3987.36,3839.69 3987.36,3754.69 3947.36,3754.69
$1N3155 on Bottom Layer (solid, pour order 30): 4372.36,3859.69 4412.36,3859.69 4412.36,3764.69 4372.36,3764.69
$1N3148 on Bottom Layer (solid, pour order 32): 4422.36,3859.69 4462.36,3859.69 4462.36,3764.69 4422.36,3764.69
$1N17152 on Bottom Layer (solid, pour order 34): 4692.36,3674.69 4772.36,3674.69 4772.36,3549.69 4692.36,3549.69
$1N2515 on Bottom Layer (solid, pour order 36): 3772.36,4049.69 3862.36,4049.69 3862.36,4009.69 3772.36,4009.69
$1N2508 on Bottom Layer (solid, pour order 38): 3772.36,4099.69 3857.36,4099.69 3857.36,4064.69 3772.36,4064.69
$1N2502 on Bottom Layer (solid, pour order 40): 3777.36,4529.69 3867.36,4529.69 3867.36,4489.69 3777.36,4489.69
$1N2496 on Bottom Layer (solid, pour order 42): 3777.36,4579.69 3872.36,4579.69 3872.36,4544.69 3777.36,4544.69
$1N3547 on Bottom Layer (solid, pour order 44): 3632.36,4589.69 3752.36,4589.69 3752.36,4539.69 3632.36,4539.69
$1N16896 on Bottom Layer (solid, pour order 46): 4637.36,4594.69 4757.36,4594.69 4757.36,4544.69 4637.36,4544.69
$1N3102 on Bottom Layer (solid, pour order 48): 4522.36,4589.69 4612.36,4589.69 4612.36,4549.69 4522.36,4549.69
$1N3111 on Bottom Layer (solid, pour order 50): 4522.36,4534.69 4612.36,4534.69 4612.36,4494.69 4522.36,4494.69
$1N17239 on Bottom Layer (solid, pour order 52): 4517.36,4054.69 4612.36,4054.69 4612.36,4014.69 4517.36,4014.69
$1N17244 on Bottom Layer (solid, pour order 54): 4517.36,4109.69 4612.36,4109.69 4612.36,4070.1 4517.36,4070.1
$1N3136 on Bottom Layer (solid, pour order 56): 4692.36,3789.69 4732.36,3789.69 4732.36,3699.69 4692.36,3699.69
$1N3142 on Bottom Layer (solid, pour order 58): 4637.36,3789.69 4677.36,3789.69 4677.36,3699.69 4637.36,3699.69
$1N3571 on Bottom Layer (solid, pour order 60): 3617.36,4109.69 3747.36,4109.69 3747.36,4054.69 3617.36,4054.69
$1N16947 on Bottom Layer (solid, pour order 62): 4637.36,4114.69 4757.36,4114.69 4757.36,4064.69 4637.36,4064.69
$1N2525 on Bottom Layer (solid, pour order 64): 3647.36,3779.69 3687.36,3779.69 3687.36,3689.69 3647.36,3689.69
$1N20017 on Bottom Layer (solid, pour order 66): 4417.36,3744.69 4467.36,3744.69 4467.36,3619.69 4417.36,3619.69

## Keep-outs
Board Outline Layer:
  the board outline again, w10

## Other copper
Top Layer:
  region net 5V_USB: 4374.5,4158.15 4374.5,4168.15 ccw(c4374.5,4194.2) 4389.5,4172.9 4389.5,4150.65 ccw(c4374.5,4139.4)
  region net $1N881: 3970.7,4139.17 3975.8,4130.13 ccw(c3997.02,4114.22) 3970.5,4114.22 3954.79,4133.87 ccw(c3954.79,4160.38)
  region net GND: 4393.46,4236.16 4386.39,4243.23 ccw(c4358.52,4257.09) 4389.64,4257.09 4409.29,4241.38 ccw(c4409.29,4214.79)
  region net GND: 4440.08,4262.13 4440.08,4252.13 ccw(c4440.08,4233.38) 4425.08,4244.63 4425.08,4269.63 ccw(c4440.08,4280.88)
  region net 3.3V: 4379.92,4307.25 4379.92,4317.25 ccw(c4379.92,4327.3) 4389.64,4324.75 4389.64,4299.75 ccw(c4379.92,4297.2)
  region net 3.3V: 3689.8,4681.97 3679.8,4681.97 ccw(c3661.05,4681.97) 3672.3,4696.97 3697.3,4696.97 ccw(c3708.55,4681.97)
  region net $1N2306: 3970.97,4279.92 3968.17,4268.59 ccw(c3952.26,4247.37) 3952.26,4273.89 3964.99,4295.15 ccw(c3987.35,4295.15)
  region net 3.3V: 4794.16,4909.73 4800.48,4921.73 4802.06,4921.89 4803.67,4922.35 4805.29,4923.07 4806.92,4924.03 4810.19,4926.48 4813.44,4929.43 4819.69,4935.73 4822.59,4938.51 4825.29,4940.69 4818.97,4887.92 4815.7,4891.99 4813.04,4895.93 4810.69,4899.61 4808.4,4902.91 4807.18,4904.38 4805.87,4905.7 4804.43,4906.87 4802.84,4907.86 4801.05,4908.65 4799.03,4909.24 4796.74,4909.61
  region net $1N12022: 3949.96,4776.01 3949.96,4786.01 ccw(c3949.96,4804.76) 3964.96,4793.51 3964.96,4768.51 ccw(c3949.96,4757.26)
  region net $1N1310: 4012.66,4347.34 4002.66,4347.34 ccw(c3983.91,4347.34) 3995.16,4362.34 4020.16,4362.34 ccw(c4031.41,4347.34)
  region net DAISY: 4002.66,4468.41 4012.66,4468.41 ccw(c4031.41,4468.41) 4020.16,4453.41 3995.16,4453.41 ccw(c3983.91,4468.41)
  region net 3.3V: 3978.64,4524.46 3972.7,4532.66 ccw(c3951.49,4548.57) 3978,4548.57 3994.55,4529.76 ccw(c3994.55,4503.24)
  region net 3.3V: 3972.7,4560.88 3979.49,4568.23 ccw(c3994.55,4591.47) 3994.55,4563.78 3978,4544.97 ccw(c3951.49,4544.97)
  region net RST: 4048.2,4578.78 4058.2,4578.78 ccw(c4076.95,4578.78) 4065.7,4563.78 4040.7,4563.78 ccw(c4029.45,4578.78)
  region net RST: 4058.2,4514.76 4048.2,4514.76 ccw(c4029.45,4514.76) 4040.7,4529.76 4065.7,4529.76 ccw(c4076.95,4514.76)
  region net $1N12022: 3951.85,4786.01 3951.85,4776.01 ccw(c3951.85,4721.78) 3936.85,4773.9 3936.85,4793.51 ccw(c3951.85,4804.76)
  region net SPI1_MOSI: 4119.2,4576.94 4129.2,4576.94 ccw(c4147.95,4576.94) 4136.7,4561.94 4111.7,4561.94 ccw(c4100.45,4576.94)
  region net SDI: 4129.2,4455.87 4119.2,4455.87 ccw(c4100.45,4455.87) 4111.7,4470.87 4136.7,4470.87 ccw(c4147.95,4455.87)
  region net SPI1_MISO: 4171.5,4576.94 4181.5,4576.94 ccw(c4200.25,4576.94) 4189,4561.94 4164,4561.94 ccw(c4152.75,4576.94)
  region net SDO: 4181.5,4455.87 4171.5,4455.87 ccw(c4152.75,4455.87) 4164,4470.87 4189,4470.87 ccw(c4200.25,4455.87)
  region net SPI1_SCK: 4222.53,4576.94 4232.53,4576.94 ccw(c4251.28,4576.94) 4240.03,4561.94 4215.03,4561.94 ccw(c4203.78,4576.94)
  region net SCLK: 4232.53,4465.53 4222.53,4465.53 ccw(c4215.03,4462.93) 4215.03,4470.87 4240.03,4470.87 ccw(c4240.03,4462.93)
  region net SPI1_CS: 4274.58,4576.87 4284.58,4576.87 ccw(c4303.33,4576.87) 4292.08,4561.87 4267.08,4561.87 ccw(c4255.83,4576.87)
  region net CS: 4284.58,4466.29 4274.58,4466.29 ccw(c4267.08,4462.3) 4267.08,4470.8 4292.08,4470.8 ccw(c4292.08,4462.3)
  region net $1N17369: 3852.89,4279.99 3842.89,4279.99 3842.72,4281.73 3842.22,4283.63 3841.47,4285.43 3840.51,4286.88 3855.27,4286.88 3854.32,4285.43 3853.56,4283.63 3853.07,4281.73
  region net SDI: 4113.36,4325.69 4113.36,4315.69 ccw(c4113.36,4211.65) 4099.66,4314.78 4099.66,4326.59 ccw(c4113.36,4429.72)
  region net AGND: 4109.89,4227.17 4109.89,4217.17 ccw(c4109.89,4157.84) 4099.56,4216.26 4099.56,4228.07 ccw(c4109.89,4286.5)
  region net $1N2515: 4114.56,4050 4114.56,4040 ccw(c4114.56,3915.23) 4099.56,4039.09 4099.56,4050.9 ccw(c4114.56,4174.76)
  region net 5V_USB: 4261.76,4158.15 4261.76,4168.15 ccw(c4261.76,4292.91) 4276.76,4169.05 4276.76,4157.24 ccw(c4261.76,4033.38)
  region net 5V_USB: 4342.94,4168.15 4342.94,4158.15 ccw(c4342.94,4033.38) 4327.94,4157.24 4327.94,4169.05 ccw(c4342.94,4292.91)
  region net 3.3V: 4264.56,4236.89 4264.56,4246.89 ccw(c4264.56,4329.66) 4276.76,4247.79 4276.76,4235.98 ccw(c4264.56,4154.11)
  region net 5V_USB: 3868.03,4191.2 3885.98,4187.4 ccw(c3908.06,4209.48) 3899.3,4179.5 3877.55,4179.5 ccw(c3815.9,4139.07)
  region net $1N17369: 3862.55,4237.49 3862.55,4247.49 ccw(c3862.55,4267.42) 3877.55,4254.3 3877.55,4230.68 ccw(c3862.55,4217.57)
  region net 3.3V: 3691.14,4982.54 3679.14,4982.54 ccw(c3656.64,4982.54) 3670.14,5000.54 3700.14,5000.54 ccw(c3713.64,4982.54)
  region net $1N2496: 4029.18,4124.94 4022.11,4117.87 4021.24,4118.61 4020.26,4119.23 4018.05,4120.16 4015.68,4120.72 4013.33,4120.98 4026.07,4133.72 4026.33,4131.37 4026.89,4129 4027.82,4126.79 4028.44,4125.81
  region net $1N11929: 4176.35,4256.98 4177.17,4266.98 4178.31,4267.06 4179.44,4267.31 4181.63,4268.17 4183.69,4269.39 4185.58,4270.79 4184.76,4252.8 4182.96,4254.33 4180.87,4255.67 4178.63,4256.62 4177.49,4256.88
  region net $1N2534: 3975.1,3902.21 3985.1,3902.21 3985.19,3901.07 3985.45,3899.93 3986.36,3897.72 3987.64,3895.65 3989.11,3893.8 3971.1,3893.8 3972.57,3895.65 3973.85,3897.72 3974.76,3899.93 3975.01,3901.07
  region net $1N2549: 4022.36,3881.04 4032.36,3881.04 4032.45,3879.9 4032.71,3878.77 4033.61,3876.55 4034.9,3874.48 4036.37,3872.63 4018.36,3872.63 4019.83,3874.48 4021.11,3876.55 4022.02,3878.77 4022.27,3879.9
  region net $1N3155: 4345.41,3939.67 4355.41,3939.67 4355.5,3938.54 4355.76,3937.4 4356.66,3935.19 4357.95,3933.11 4359.42,3931.27 4341.41,3931.27 4342.88,3933.11 4344.16,3935.19 4345.07,3937.4 4345.32,3938.54
  region net $1N3148: 4438.53,3902.42 4448.53,3902.42 4448.62,3901.28 4448.88,3900.15 4449.79,3897.94 4451.07,3895.86 4452.54,3894.02 4434.53,3894.02 4436,3895.86 4437.28,3897.94 4438.19,3900.15 4438.44,3901.28
  region net $1N3142: 4607.64,3798.91 4614.71,3805.98 4615.58,3805.24 4616.56,3804.62 4618.77,3803.69 4621.14,3803.13 4623.49,3802.87 4610.75,3790.13 4610.49,3792.48 4609.93,3794.85 4609,3797.06 4608.38,3798.04
  region net $1N3136: 4669.15,3805.65 4669.15,3815.65 4670.29,3815.74 4671.42,3816 4673.64,3816.9 4675.71,3818.19 4677.56,3819.66 4677.56,3801.65 4675.71,3803.12 4673.64,3804.4 4671.42,3805.31 4670.29,3805.56
  region net $1N17239: 4466.3,4040.09 4473.79,4050.09 4475.85,4050.21 4478.03,4050.55 4482.19,4051.59 4474.71,4035.2 4474.11,4036.23 4473.3,4037.17 4472.31,4038 4471.2,4038.71 4470,4039.29 4468.75,4039.72 4467.51,4039.99
  region net $1N2515: 4098.06,4040 4097.97,4050 4099.1,4050.09 4100.24,4050.34 4102.46,4051.25 4104.53,4052.54 4106.37,4054.02 4106.46,4036.01 4104.61,4037.47 4102.54,4038.75 4100.33,4039.65 4099.19,4039.91
  region net $1N2525: 3893.71,3939.69 3893.71,3929.69 3892.57,3929.6 3891.44,3929.35 3889.22,3928.44 3887.15,3927.16 3885.3,3925.69 3885.3,3943.7 3887.15,3942.23 3889.22,3940.94 3891.44,3940.04 3892.57,3939.78
  region net $1N2541: 3905.39,3889.79 3912.46,3882.72 3911.72,3881.85 3911.09,3880.87 3910.17,3878.66 3909.61,3876.28 3909.35,3873.94 3896.61,3886.68 3898.95,3886.94 3901.33,3887.5 3903.54,3888.42 3904.52,3889.05
  region net $1N3111: 4399.34,4099.6 4392.27,4106.67 4393.01,4107.53 4393.63,4108.52 4394.55,4110.72 4395.11,4113.1 4395.38,4115.44 4408.11,4102.71 4405.77,4102.44 4403.39,4101.88 4401.19,4100.96 4400.2,4100.34
  region net 5V_USB: 4272.51,4168.15 4262.52,4158.15 4258.3,4158.15 4256.27,4158.05 4254.11,4157.81 4264.1,4172.21 4264.54,4170.97 4265.22,4170.02 4266.12,4169.3 4267.19,4168.79 4268.4,4168.46 4269.72,4168.26
  region net 3.3V: 4276.93,4246.89 4280.22,4236.89 4279.1,4236.78 4277.93,4236.49 4275.6,4235.45 4273.48,4233.98 4271.82,4232.29 4268.52,4250 4270.51,4248.85 4272.57,4247.86 4274.7,4247.15
  region net 5V_USB: 3793.61,4321.34 3783.61,4321.34 3783.52,4322.48 3783.27,4323.62 3782.36,4325.83 3781.08,4327.9 3779.61,4329.75 3797.62,4329.75 3796.15,4327.9 3794.86,4325.83 3793.96,4323.62 3793.7,4322.48